# Altium PCB PCB.PcbDoc (part 1 of 2)
Units mm, origin at the board's own origin, x right, y up, seen from the top; angles counter-clockwise.
Board outline 200 x 200 mm, 2 copper layers (Top Layer, Bottom Layer); 385 components, 542 nets, 2285 pads, 56 vias.
Unrouted connection lines stored in the file: 1302.
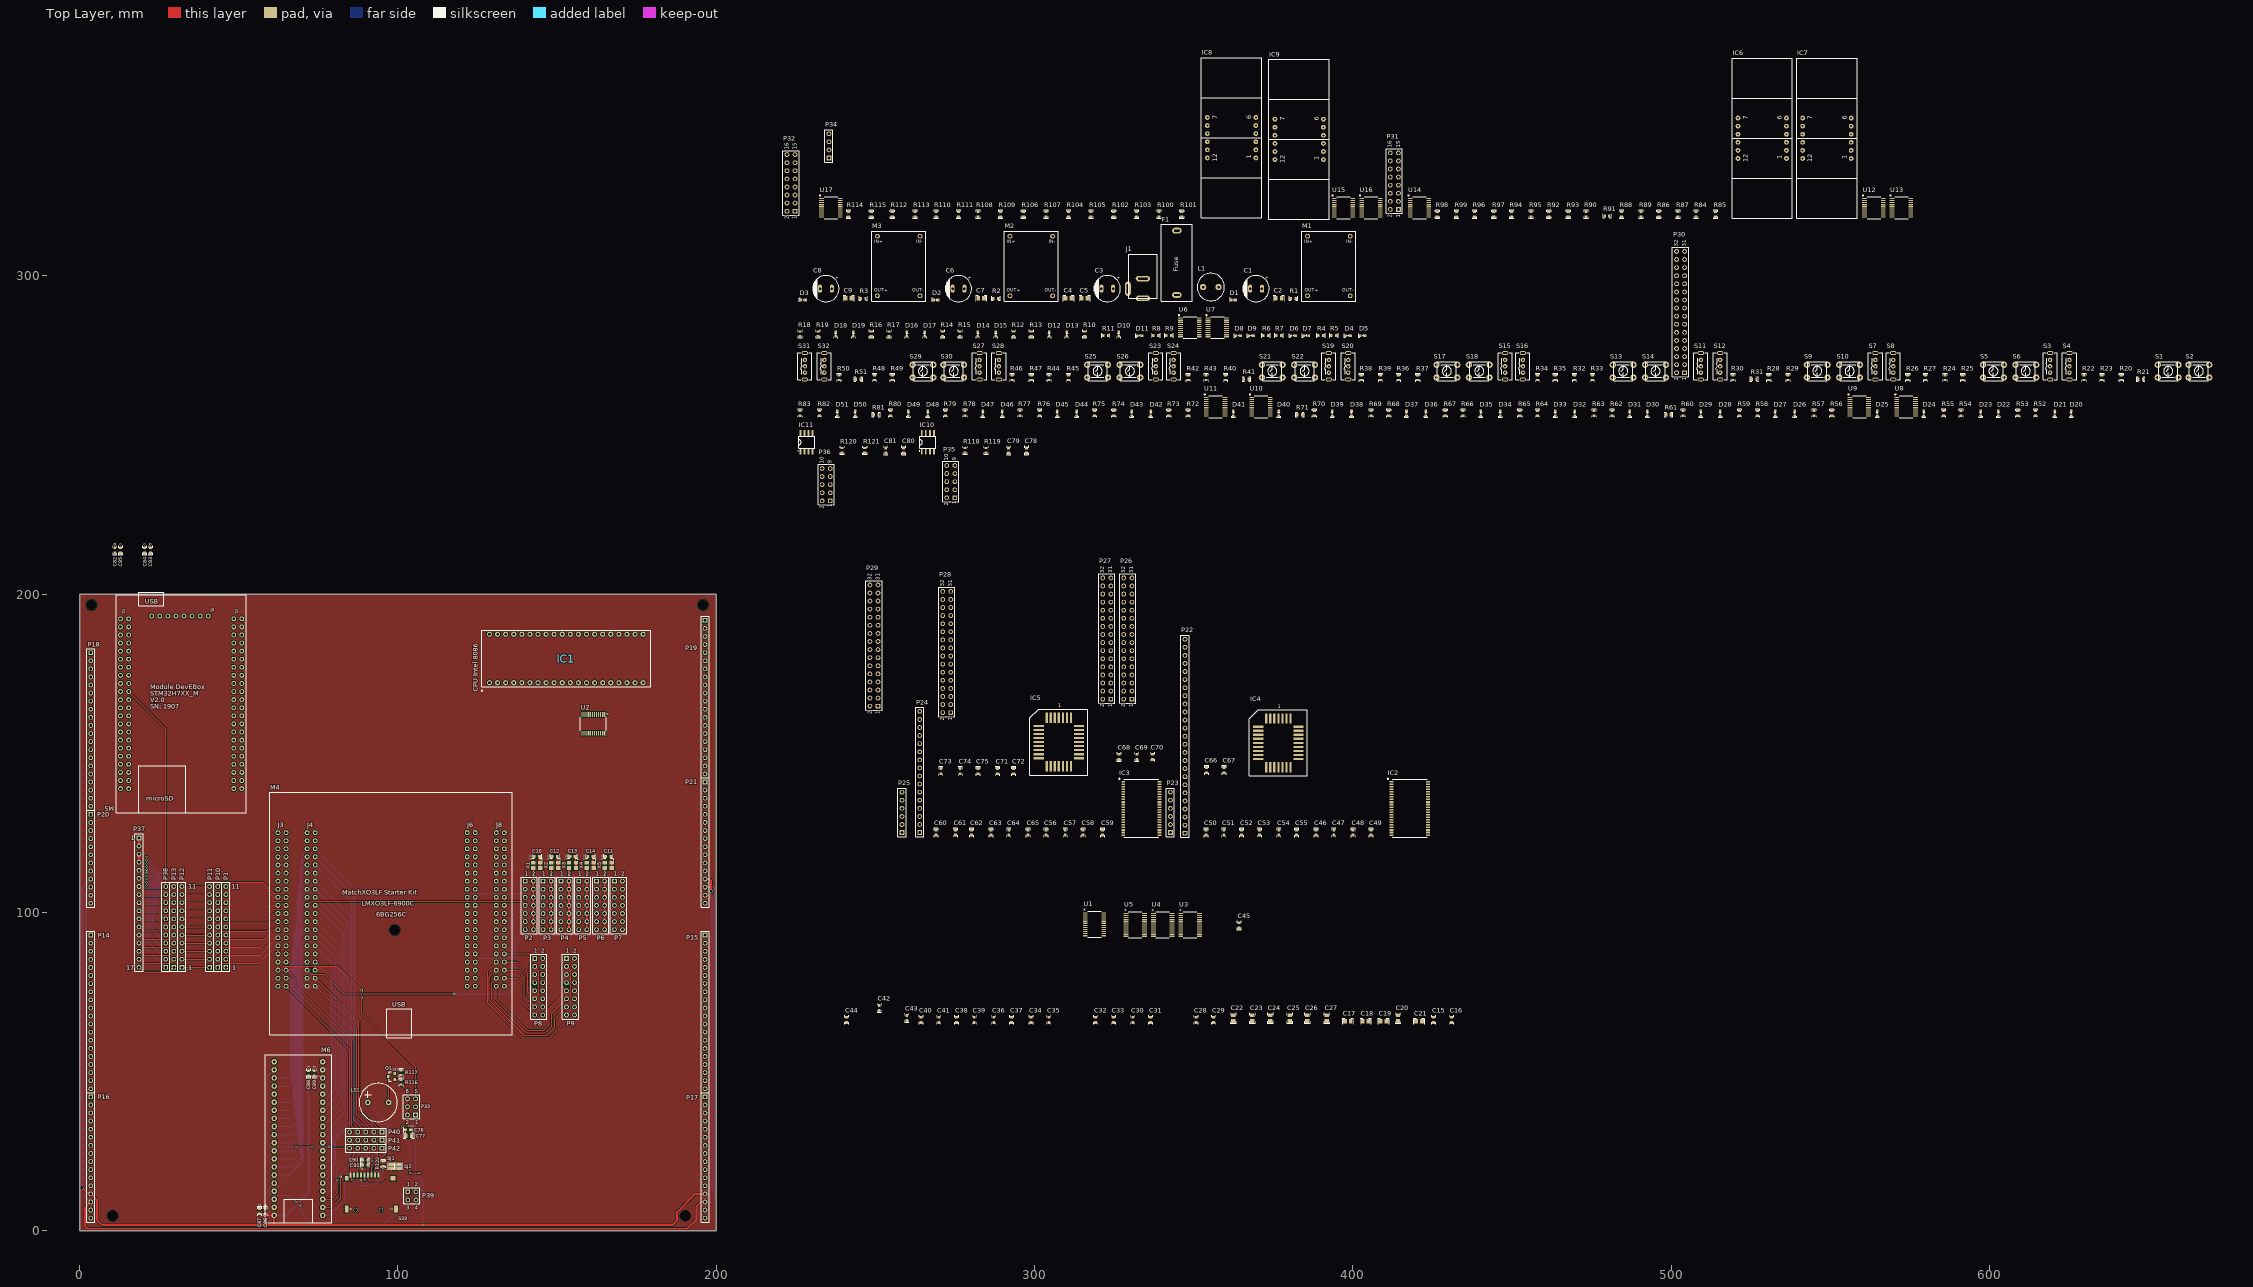
[diagram p0: Top Layer view]
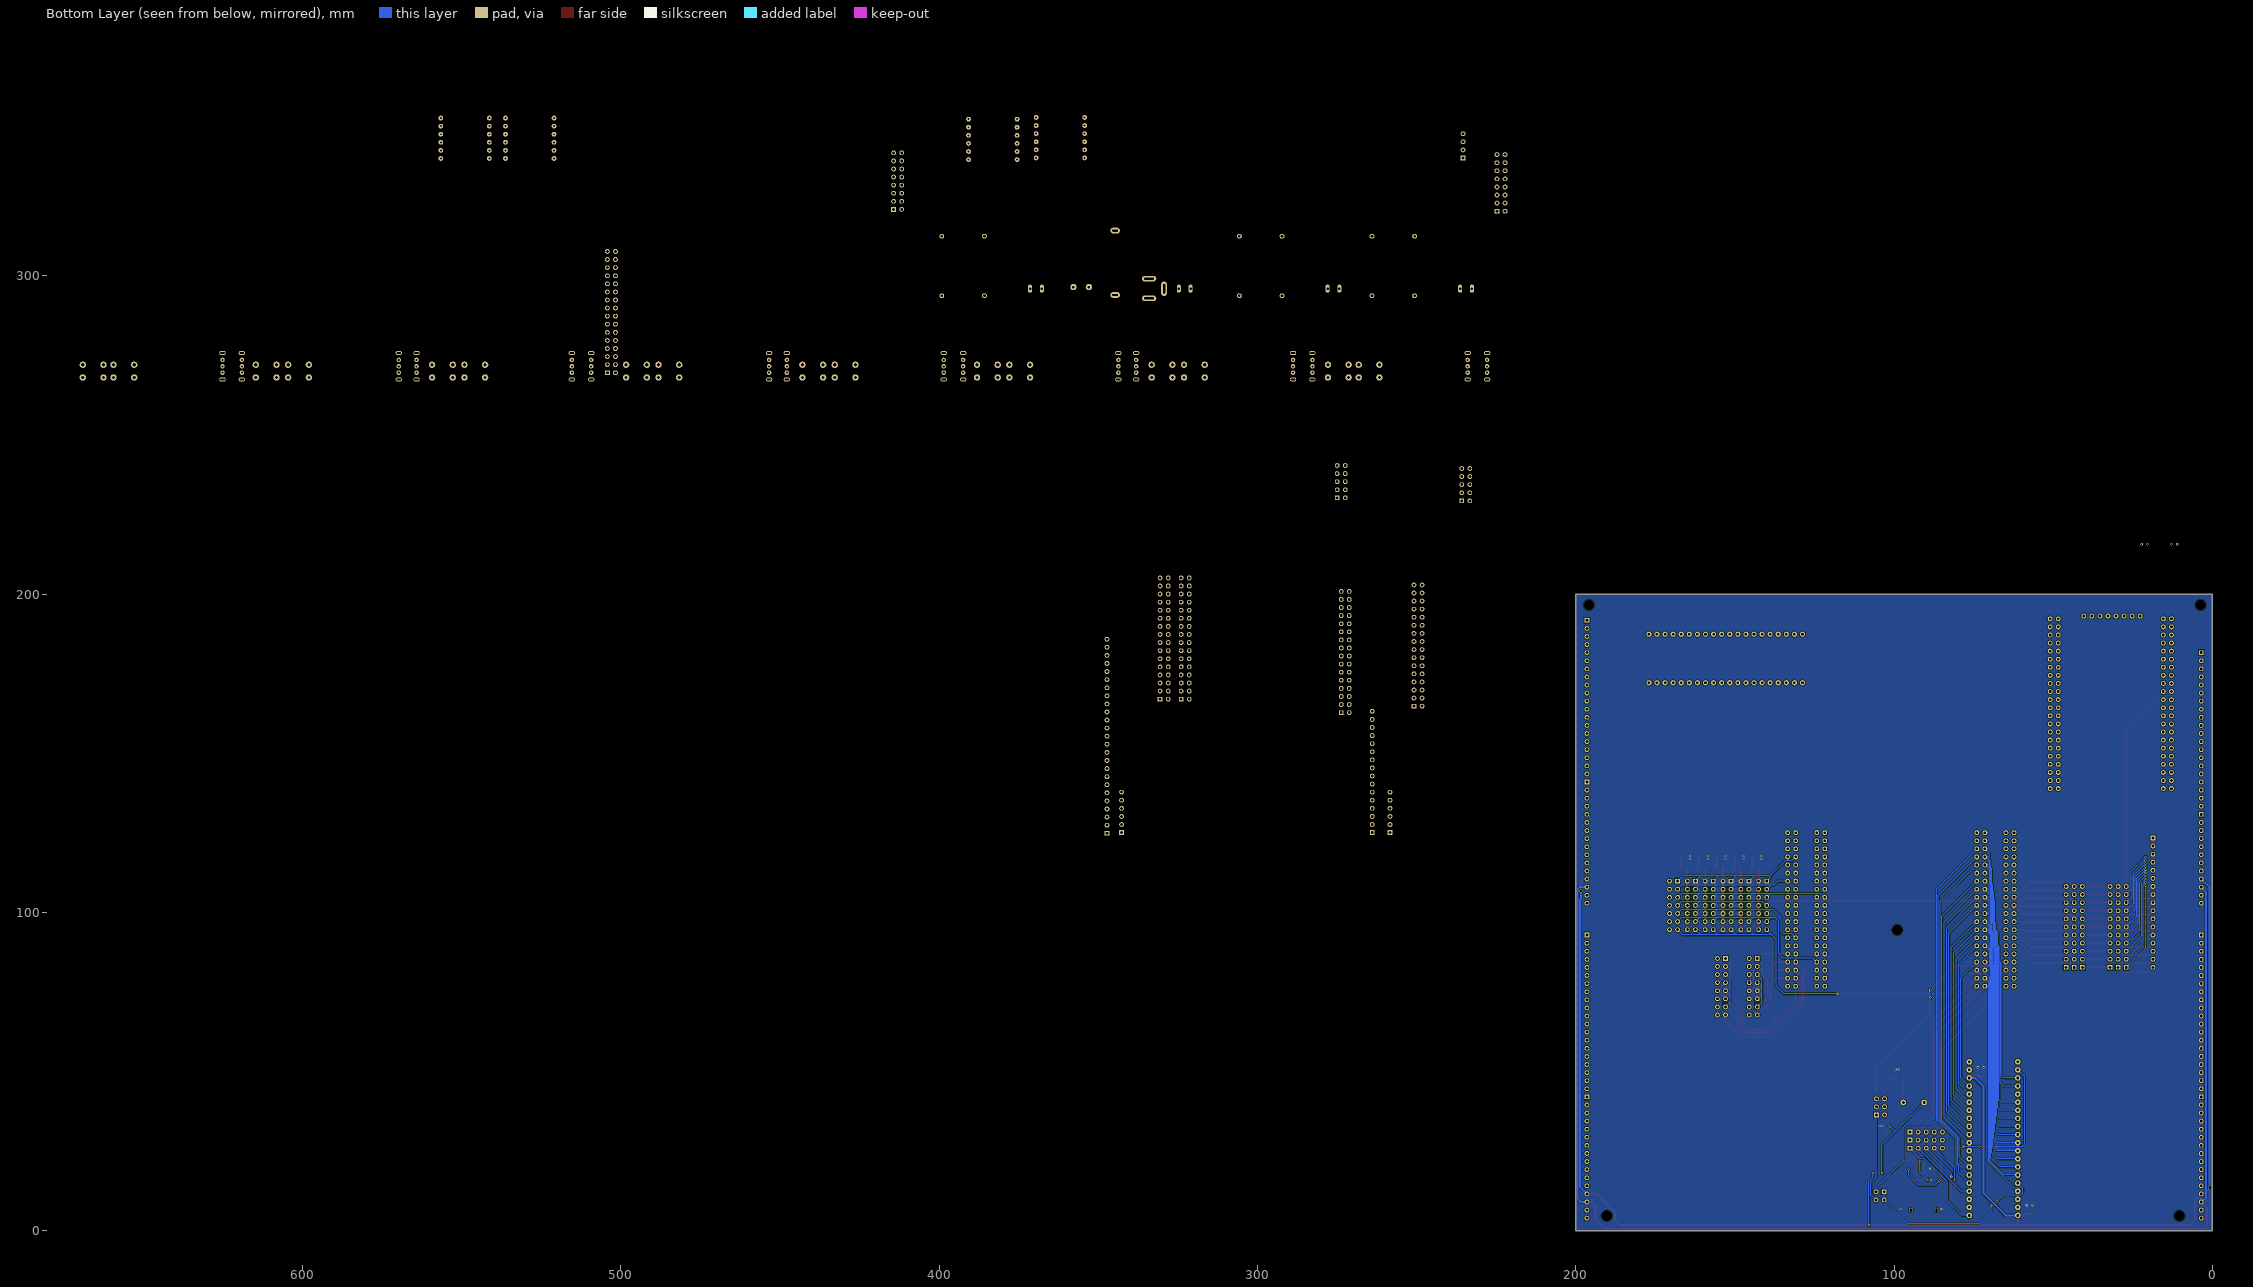
[diagram p1: Bottom Layer view, seen from below]

## Layer stack, top to bottom
Top Solder: solder mask 0.0102, Solder Resist, Dk 3.5
Top Layer: signal copper 0.0356
Dielectric 1: dielectric 0.32, FR-4, Dk 4.8
Bottom Layer: signal copper 0.0356
Bottom Solder: solder mask 0.0102, Solder Resist, Dk 3.5

## Board outline
0,0 0,200 200,200 200,0

## Design rules (kind name [scope] priority, off if disabled: settings)
Clearance [All] p1: gap=0.254 ignorepadtopadclearanceinfootprint=FALSE except(0.16: Arc-Arc Arc-Track Arc-SMDPad Arc-THPad Arc-Via Track-Track Track-SMDPad Track-THPad Track-Via SMDPad-Via THPad-Via Via-Via)
PolygonConnect [All] p1: connectstyle=Relief reliefconductorwidth=0.254 reliefentries=4 polygonreliefangle="90 Angle" airgapwidth=0.254
RoutingVias [All] p1: holewidth=0.3 width=0.7 viastyle="Through Hole" minholewidth=0.3 minwidth=0.4 maxholewidth=2 maxwidth=2.5
SolderMaskExpansion [All] p1: expansion=0.102 istentingtop=FALSE
SupplyNets "Schematic Supply Nets_3" [InNet('Vdd_5V_LCD')] p1: voltage=0.000
SupplyNets "Schematic Supply Nets_2" [InNet('GND')] p2: voltage=0.000
SupplyNets "Schematic Supply Nets_1" [InNet('Vdd_3.3V')] p3: voltage=0.000
SupplyNets "Schematic Supply Nets" [InNet('Vdd_5V')] p4: voltage=0.000
Width [All] p1: maxlimit=2.5 minlimit=0.16 preferedwidth=0.254
30 further rules are at their usual default settings.

## Classes and differential pairs
component class micro_sd: C90 C91 P40 P41 P42 R122 S33 SJ1 SJ2
component class USB_TTL_converter: P34
component class stm32h750: C82 C83 C84 C85 M5
component class stm32f411: C86 C87 C88 C89 M6 P39
component class seven_segment_displays: IC6 IC7 IC8 IC9 P31 P32 R84 R85 R86 R87 R88 R89 R90 R91 R92 R93 R94 R95 R96 R97 R98 R99 R100 R101 R102 R103 R104 R105 R106 R107 R108 R109 R110 R111 R112 R113 R114 R115 U12 U13 U14 U15 U16 U17
component class power_supply: C1 C2 C3 C4 C5 C6 C7 C8 C9 D1 D2 D3 F1 J1 L1 M1 M2 M3 R1 R2 R3
component class pc_data_bus_leds: D4 D5 D6 D7 D8 D9 D10 D11 D12 D13 D14 D15 D16 D17 D18 D19 R4 R5 R6 R7 R8 R9 R10 R11 R12 R13 R14 R15 R16 R17 R18 R19 U6 U7
component class pc_data_bus_input_switches: P30 R20 R21 R22 R23 R24 R25 R26 R27 R28 R29 R30 R31 R32 R33 R34 R35 R36 R37 R38 R39 R40 R41 R42 R43 R44 R45 R46 R47 R48 R49 R50 R51 S1 S2 S3 S4 S5 S6 S7 S8 S9 S10 S11 S12 S13 S14 S15 S16 S17 S18 S19 S20 S21 S22 S23 S24 S25 S26 S27 S28 S29 S30 S31 S32
component class pc_address_bus_leds: D20 D21 D22 D23 D24 D25 D26 D27 D28 D29 D30 D31 D32 D33 D34 D35 D36 D37 D38 D39 D40 D41 D42 D43 D44 D45 D46 D47 D48 D49 D50 D51 R52 R53 R54 R55 R56 R57 R58 R59 R60 R61 R62 R63 R64 R65 R66 R67 R68 R69 R70 R71 R72 R73 R74 R75 R76 R77 R78 R79 R80 R81 R82 R83 U8 U9 U10 U11
component class NOR_flash: C78 C79 C80 C81 IC10 IC11 P35 P36 R118 R119 R120 R121
component class LCD_RGB_parallel_connector: P12 P13 P37 P38
component class IBM_PC_ROM_BIOS: C66 C67 C68 C69 C70 C71 C72 C73 C74 C75 IC4 IC5 P26 P27 P28 P29
component class IBM_PC_RAM: C46 C47 C48 C49 C50 C51 C52 C53 C54 C55 C56 C57 C58 C59 C60 C61 C62 C63 C64 C65 IC2 IC3 P22 P23 P24 P25
component class IBM_PC_CPU: C15 C16 C17 C18 C19 C20 C21 C22 C23 C24 C25 C26 C27 C28 C29 C30 C31 C32 C33 C34 C35 C36 C37 C38 C39 C40 C41 C42 C43 C44 C45 IC1 U1 U2 U3 U4 U5
component class FPGA_J6_J8: C10 C11 C12 C13 C14 P2 P3 P4 P5 P6 P7 P8 P9 X1 X2 X3 X4 X5
component class FPGA_J3_J4: M4 P1 P10 P11
component class FPGA_breadboard_connections: P14 P15 P16 P17 P18 P19 P20 P21
component class buzzer: C76 C77 LS1 P33 Q1 R116 R117

## Components (designator, comment, footprint, x,y, rotation, side; value= is the part's Value field where it differs from the comment)
C1 "Electrolytic capacitor" "electrolytic 470uF/25V" 369.58,296.006 r0 top value=470uF
C2 "ceramic capacitor" "capacitor 0805" 376.692,292.958 r0 top value=100nF
C3 "Electrolytic capacitor" "electrolytic 470uF/25V" 322.844,296.006 r0 top value=470uF
C4 "ceramic capacitor" "capacitor 0805" 310.652,292.958 r0 top value=100nF
C5 "ceramic capacitor" "capacitor 0805" 315.732,292.958 r0 top value=100nF
C6 "Electrolytic capacitor" "electrolytic 470uF/25V" 276.108,296.006 r0 top value=470uF
C7 "ceramic capacitor" "capacitor 0805" 283.22,292.958 r0 top value=100nF
C8 "Electrolytic capacitor" "electrolytic 470uF/25V" 234.452,296.006 r0 top value=470uF
C9 "ceramic capacitor" "capacitor 0805" 241.564,292.958 r0 top value=100nF
C10 "ceramic capacitor" "capacitor 0603" 143.64,117.675 r0 top value=100nF
C11 "ceramic capacitor" "capacitor 0603" 166.04,117.675 r0 top value=100nF
C12 "ceramic capacitor" "capacitor 0603" 149.24,117.675 r0 top value=100nF
C13 "ceramic capacitor" "capacitor 0603" 154.84,117.675 r0 top value=100nF
C14 "ceramic capacitor" "capacitor 0603" 160.44,117.675 r0 top value=100nF
C15 "ceramic capacitor" "capacitor 0603" 425.336,66.33 r90 top value=10uF
C16 "Ceramic capacitor" "capacitor 0603" 430.924,66.33 r90 top value=100nF
C17 "ceramic capacitor" "capacitor 0805" 398.412,65.822 r0 top value=22uF
C18 "ceramic capacitor" "capacitor 0805" 404,65.822 r0 top value=22uF
C19 "ceramic capacitor" "capacitor 0805" 409.588,65.822 r0 top value=22uF
C20 "ceramic capacitor" "capacitor 0805" 414.16,66.838 r90 top value=22uF
C21 "ceramic capacitor" "capacitor 0805" 420.764,65.822 r0 top value=22uF
C22 "ceramic capacitor" "capacitor 0805" 362.344,66.838 r90 top value=100nF
C23 "ceramic capacitor" "capacitor 0805" 368.44,66.838 r90 top value=100nF
C24 "ceramic capacitor" "capacitor 0805" 374.028,66.838 r90 top value=100nF
C25 "ceramic capacitor" "capacitor 0805" 380.124,66.838 r90 top value=100nF
C26 "ceramic capacitor" "capacitor 0805" 385.712,66.838 r90 top value=10nF
C27 "ceramic capacitor" "capacitor 0805" 391.808,66.838 r90 top value=10nF
C28 "Ceramic capacitor" "capacitor 0603" 350.66,66.33 r90 top value=100nF
C29 "ceramic capacitor" "capacitor 0603" 356.248,66.33 r90 top value=10uF
C30 "Ceramic capacitor" "capacitor 0603" 330.848,66.33 r90 top value=100nF
C31 "ceramic capacitor" "capacitor 0603" 336.436,66.33 r90 top value=10uF
C32 "ceramic capacitor" "capacitor 0603" 319.164,66.33 r90 top value=10uF
C33 "Ceramic capacitor" "capacitor 0603" 324.752,66.33 r90 top value=100nF
C34 "ceramic capacitor" "capacitor 0603" 298.844,66.33 r90 top value=10uF
C35 "Ceramic capacitor" "capacitor 0603" 304.432,66.33 r90 top value=100nF
C36 "ceramic capacitor" "capacitor 0603" 287.16,66.33 r90 top value=10uF
C37 "Ceramic capacitor" "capacitor 0603" 292.748,66.33 r90 top value=100nF
C38 "ceramic capacitor" "capacitor 0603" 275.476,66.33 r90 top value=10uF
C39 "Ceramic capacitor" "capacitor 0603" 281.064,66.33 r90 top value=100nF
C40 "Ceramic capacitor" "capacitor 0603" 264.3,66.33 r90 top value=100nF
C41 "ceramic capacitor" "capacitor 0603" 269.888,66.33 r90 top value=10uF
C42 "Ceramic capacitor" "capacitor 0603" 251.2,70.05 r90 top value=100nF
C43 "ceramic capacitor" "capacitor 0603" 259.82,66.93 r90 top value=10uF
C44 "Ceramic capacitor" "capacitor 0603" 240.932,66.33 r90 top value=100nF
C45 "ceramic capacitor" "capacitor 0603" 364.218,96.014 r90 top value=10uF
C46 "ceramic capacitor" "capacitor 0603" 388.388,125.134 r90 top value=22uF
C47 "ceramic capacitor" "capacitor 0603" 393.976,125.134 r90 top value=22uF
C48 "ceramic capacitor" "capacitor 0603" 400.072,125.134 r90 top value=22uF
C49 "ceramic capacitor" "capacitor 0603" 405.66,125.134 r90 top value=22uF
C50 "Ceramic capacitor" "capacitor 0603" 353.844,125.134 r90 top value=10nF
C51 "Ceramic capacitor" "capacitor 0603" 359.432,125.134 r90 top value=10nF
C52 "Ceramic capacitor" "capacitor 0603" 365.02,125.134 r90 top value=100nF
C53 "Ceramic capacitor" "capacitor 0603" 370.608,125.134 r90 top value=100nF
C54 "Ceramic capacitor" "capacitor 0603" 376.704,125.134 r90 top value=100nF
C55 "Ceramic capacitor" "capacitor 0603" 382.292,125.134 r90 top value=100nF
C56 "ceramic capacitor" "capacitor 0603" 303.552,125.134 r90 top value=22uF
C57 "ceramic capacitor" "capacitor 0603" 309.648,125.134 r90 top value=22uF
C58 "ceramic capacitor" "capacitor 0603" 315.236,125.134 r90 top value=22uF
C59 "ceramic capacitor" "capacitor 0603" 321.332,125.134 r90 top value=22uF
C60 "Ceramic capacitor" "capacitor 0603" 269.008,125.134 r90 top value=10nF
C61 "Ceramic capacitor" "capacitor 0603" 275.104,125.134 r90 top value=10nF
C62 "Ceramic capacitor" "capacitor 0603" 280.184,125.134 r90 top value=100nF
C63 "Ceramic capacitor" "capacitor 0603" 286.28,125.134 r90 top value=100nF
C64 "Ceramic capacitor" "capacitor 0603" 291.868,125.134 r90 top value=100nF
C65 "Ceramic capacitor" "capacitor 0603" 297.964,125.134 r90 top value=100nF
C66 "ceramic capacitor" "capacitor 0603" 354,144.75 r90 top value=22uF
C67 "ceramic capacitor" "capacitor 0603" 359.5,144.75 r90 top value=22uF
C68 "Ceramic capacitor" "capacitor 0603" 326.5,148.938 r90 top value=10nF
C69 "Ceramic capacitor" "capacitor 0603" 332.088,148.938 r90 top value=100nF
C70 "Ceramic capacitor" "capacitor 0603" 337,148.95 r90 top value=100nF
C71 "ceramic capacitor" "capacitor 0603" 288.312,144.438 r90 top value=22uF
C72 "ceramic capacitor" "capacitor 0603" 293.392,144.438 r90 top value=22uF
C73 "Ceramic capacitor" "capacitor 0603" 270.532,144.438 r90 top value=10nF
C74 "Ceramic capacitor" "capacitor 0603" 276.628,144.438 r90 top value=100nF
C75 "Ceramic capacitor" "capacitor 0603" 282.216,144.438 r90 top value=100nF
C76 "ceramic capacitor" "capacitor 0603" 103.2,31.8 r180 top value=22uF
C77 "ceramic capacitor" "capacitor 0805" 103.4,29.9 r0 top value=100nF
C78 "ceramic capacitor" "capacitor 0603" 297.444,245.206 r90 top value=10uF
C79 "Ceramic capacitor" "capacitor 0603" 291.856,245.206 r90 top value=100nF
C80 "ceramic capacitor" "capacitor 0603" 258.836,245.206 r90 top value=10uF
C81 "Ceramic capacitor" "capacitor 0603" 253.248,245.206 r90 top value=100nF
C82 "ceramic capacitor" "capacitor 0603" 11.027,213.804 r270 top value=10uF
C83 "ceramic capacitor" "capacitor 0603" 22.227,213.804 r270 top value=10uF
C84 "Ceramic capacitor" "capacitor 0603" 20.4,213.804 r270 top value=100nF
C85 "Ceramic capacitor" "capacitor 0603" 12.827,213.804 r270 top value=100nF
C86 "Ceramic capacitor" "capacitor 0603" 58.3,6.2 r270 top value=100nF
C87 "ceramic capacitor" "capacitor 0603" 56.5,6.2 r270 top value=10uF
C88 "ceramic capacitor" "capacitor 0603" 71.9,49.5 r270 top value=10uF
C89 "Ceramic capacitor" "capacitor 0603" 73.7,49.5 r270 top value=100nF
C90 "ceramic capacitor" "capacitor 0603" 89.696,22.252 r0 top value=10uF
C91 "Ceramic capacitor" "capacitor 0603" 89.696,20.679 r0 top value=100nF
D1 "Green LED" "led 0603 clear" 362.468,292.45 r0 top
D2 "Green LED" "led 0603 clear" 268.996,292.45 r0 top
D3 "Green LED" "led 0603 clear" 227.34,292.45 r0 top
D4 "red LED" "led 0603 clear" 398.536,281.274 r0 top
D5 "red LED" "led 0603 clear" 403.108,281.274 r0 top
D6 "red LED" "led 0603 clear" 381.264,281.274 r0 top
D7 "red LED" "led 0603 clear" 385.328,281.274 r0 top
D8 "red LED" "led 0603 clear" 363.992,281.274 r0 top
D9 "red LED" "led 0603 clear" 368.056,281.274 r0 top
D10 "red LED" "led 0603 clear" 326.4,281.782 r90 top
D11 "red LED" "led 0603 clear" 333.004,281.274 r0 top
D12 "red LED" "led 0603 clear" 304.556,281.782 r90 top
D13 "red LED" "led 0603 clear" 310.144,281.782 r90 top
D14 "red LED" "led 0603 clear" 282.204,281.782 r90 top
D15 "red LED" "led 0603 clear" 287.792,281.782 r90 top
D16 "red LED" "led 0603 clear" 259.852,281.782 r90 top
D17 "red LED" "led 0603 clear" 265.44,281.782 r90 top
D18 "red LED" "led 0603 clear" 237.5,281.782 r90 top
D19 "red LED" "led 0603 clear" 243.088,281.782 r90 top
D20 "red LED" "led 0603 clear" 625.612,256.89 r90 top
D21 "red LED" "led 0603 clear" 620.532,256.89 r90 top
D22 "red LED" "led 0603 clear" 602.752,256.89 r90 top
D23 "red LED" "led 0603 clear" 597.164,256.89 r90 top
D24 "red LED" "led 0603 clear" 579.384,256.89 r90 top
D25 "red LED" "led 0603 clear" 564.652,256.89 r90 top
D26 "red LED" "led 0603 clear" 538.744,256.89 r90 top
D27 "red LED" "led 0603 clear" 532.648,256.89 r90 top
D28 "red LED" "led 0603 clear" 515.376,256.89 r90 top
D29 "red LED" "led 0603 clear" 509.28,256.89 r90 top
D30 "red LED" "led 0603 clear" 492.516,256.89 r90 top
D31 "red LED" "led 0603 clear" 486.928,256.89 r90 top
D32 "red LED" "led 0603 clear" 469.656,256.89 r90 top
D33 "red LED" "led 0603 clear" 463.56,256.89 r90 top
D34 "red LED" "led 0603 clear" 446.288,256.89 r90 top
D35 "red LED" "led 0603 clear" 440.192,256.89 r90 top
D36 "red LED" "led 0603 clear" 422.92,256.89 r90 top
D37 "red LED" "led 0603 clear" 416.824,256.89 r90 top
D38 "red LED" "led 0603 clear" 399.552,256.89 r90 top
D39 "red LED" "led 0603 clear" 393.456,256.89 r90 top
D40 "red LED" "led 0603 clear" 376.692,256.89 r90 top
D41 "red LED" "led 0603 clear" 362.468,256.89 r90 top
D42 "red LED" "led 0603 clear" 336.56,256.89 r90 top
D43 "red LED" "led 0603 clear" 330.464,256.89 r90 top
D44 "red LED" "led 0603 clear" 313.192,256.89 r90 top
D45 "red LED" "led 0603 clear" 307.096,256.89 r90 top
D46 "red LED" "led 0603 clear" 289.824,256.89 r90 top
D47 "red LED" "led 0603 clear" 283.728,256.89 r90 top
D48 "red LED" "led 0603 clear" 266.456,256.89 r90 top
D49 "red LED" "led 0603 clear" 260.36,256.89 r90 top
D50 "red LED" "led 0603 clear" 243.596,256.89 r90 top
D51 "red LED" "led 0603 clear" 238.008,256.89 r90 top
F1 "Fuse" Fuse 344.688,304.134 r90 top value=1A
IC1 "CPU Intel 8086" PDIP-40PIN 177.02,172.2 r90 top
IC2 "Asynchronous SRAM 512K x 8" "TSOP II - 44pin" 417.852,132.754 r0 top
IC3 "Asynchronous SRAM 512K x 8" "TSOP II - 44pin" 333.524,132.754 r0 top
IC4 "NOR FLASH SST39VF0xx" "PLCC 32-pin" 376.58,153.31 r0 top
IC5 "NOR FLASH SST39VF0xx" "PLCC 32-pin" 307.616,153.582 r0 top
IC6 "Seven segment display x 4 digits" "4 digit, seven segment display / 50.3mm x 19mm" 528.584,343.25 r90 top
IC7 "Seven segment display x 4 digits" "4 digit, seven segment display / 50.3mm x 19mm" 548.904,343.25 r90 top
IC8 "Seven segment display x 4 digits" "4 digit, seven segment display / 50.3mm x 19mm" 361.88,343.44 r90 top
IC9 "Seven segment display x 4 digits" "4 digit, seven segment display / 50.3mm x 19mm" 383.12,342.9 r90 top
IC10 "NOR FLASH SPI" "SOP8 / SOIC8 without dissipation" 266.456,247.746 r0 top
IC11 "NOR FLASH SPI" "SOP8 / SOIC8 without dissipation" 228.356,247.746 r0 top
J1 "PWR2.5" "female connector DC-005" 334.02,292.958 r0 top
L1 "Inductor" "ferrite inductor 22uH" 355.356,296.514 r0 top value=22uH
LS1 "Buzzer" "Buzzer 12mm x 8.25mm - 6.5mm pitch" 90.557,40.347 r0 top
M1 "Module regulable Buck" "module step down MP1584" 392.44,303.118 r0 top
M2 "Module regulable Buck" "module step down MP1584" 298.968,303.118 r0 top
M3 "Module regulable Buck" "module step down MP1584" 257.312,303.118 r0 top
M4 "MachXO3LF Starter Kit" "Lattice MachXO3LF starter kit" 59.776,61.62 r0 top
M5 "Module DevEBox STM32H7XX_M" "Module DevEBox STM32H7XX_M" 11.465,131.34 r0 top
M6 "Module Black Pill V3.0" "module black pill v3.0" 68.75,29 r180 top
P1 "Header 11" HDR1X11 45.94,82.8 r90 top
P2 "Header 7X2" HDR2X7 140,109.88 r270 top
P3 "Header 7X2" HDR2X7 145.6,109.88 r270 top
P4 "Header 7X2" HDR2X7 151.2,109.88 r270 top
P5 "Header 7X2" HDR2X7 156.8,109.88 r270 top
P6 "Header 7X2" HDR2X7 162.4,109.88 r270 top
P7 "Header 7X2" HDR2X7 168,109.88 r270 top
P8 "Header 8X2" HDR2X8 142.96,85.62 r270 top
P9 "Header 8X2" HDR2X8 152.96,85.62 r270 top
P10 "Header 11" HDR1X11 43.4,82.8 r90 top
P11 "Header 11" HDR1X11 40.86,82.8 r90 top
P12 "Header 11" HDR1X11 32.14,82.8 r90 top
P13 "Header 11" HDR1X11 29.6,82.8 r90 top
P14 "Header 20" HDR1X20 3.5,92.924 r270 top
P15 "Header 20" HDR1X20 196.5,92.924 r270 top
P16 "Header 16" HDR1X16 3.5,42.124 r270 top
P17 "Header 16" HDR1X16 196.5,42.124 r270 top
P18 "Header 20" HDR1X20 3.5,181.664 r270 top
P19 "Header 20" HDR1X20 196.5,191.824 r270 top
P20 "Header 12" HDR1X12 3.5,130.864 r270 top
P21 "Header 16" HDR1X16 196.5,141.024 r270 top
P22 "Header 25" HDR1X25 347.25,124.93 r90 top
P23 "Header 6" HDR1X6 342.668,125.134 r90 top
P24 "Header 16" HDR1X16 263.928,125.134 r90 top
P25 "Header 6" HDR1X6 258.34,125.134 r90 top
P26 "Header 16X2" HDR2X16 330.556,167.05 r90 top
P27 "Header 16X2" HDR2X16 323.952,167.05 r90 top
P28 "Header 16X2" HDR2X16 273.672,162.818 r90 top
P29 "Header 16X2" HDR2X16 250.812,164.85 r90 top
P30 "Header 16X2" HDR2X16 504.2,269.59 r90 top
P31 "Header 8X2" HDR2X8 414.284,320.898 r90 top
P32 "Header 8X2" HDR2X8 224.75,320.34 r90 top
P33 "Header 3X2" HDR2X3 105.54,36.46 r90 top
P34 "Header 4" HDR1X4 235.4,337.06 r90 top
P35 "Header 5X2" HDR2X5 274.94,230.3 r90 top
P36 "Header 5X2" HDR2X5 235.8,229.36 r90 top
P37 "Header 17" HDR1X17 18.66,123.44 r270 top
P38 "Header 11" HDR1X11 27.06,82.8 r90 top
P39 "Header 2X2" HDR2X2 103.1,12.3 r270 top
P40 "Header 5" HDR1X5 94.98,31.065 r180 top
P41 "Header 5" HDR1X5 94.98,28.525 r180 top
P42 "Header 5" HDR1X5 94.98,25.985 r180 top
Q1 "AO3400A" sot-23 98,48.5 r0 top
R1 "resistor" "resistor 0603" 381.264,292.958 r0 top value=2.2k
R2 "resistor" "resistor 0603" 287.792,292.958 r0 top value=680
R3 "resistor" "resistor 0603" 246.136,292.958 r0 top value=2.2k
R4 "resistor" "resistor 0603" 389.9,281.274 r0 top value=1.5k
R5 "resistor" "resistor 0603" 393.964,281.274 r0 top value=1.5k
R6 "resistor" "resistor 0603" 372.628,281.274 r0 top value=1.5k
R7 "resistor" "resistor 0603" 376.692,281.274 r0 top value=1.5k
R8 "resistor" "resistor 0603" 338.084,281.274 r0 top value=1.5k
R9 "resistor" "resistor 0603" 342.148,281.274 r0 top value=1.5k
R10 "resistor" "resistor 0603" 315.732,281.782 r90 top value=1.5k
R11 "resistor" "resistor 0603" 322.336,281.274 r0 top value=1.5k
R12 "resistor" "resistor 0603" 293.38,281.782 r90 top value=1.5k
R13 "resistor" "resistor 0603" 298.968,281.782 r90 top value=1.5k
R14 "resistor" "resistor 0603" 271.028,281.782 r90 top value=1.5k
R15 "resistor" "resistor 0603" 276.616,281.782 r90 top value=1.5k
R16 "resistor" "resistor 0603" 248.676,281.782 r90 top value=1.5k
R17 "resistor" "resistor 0603" 254.264,281.782 r90 top value=1.5k
R18 "resistor" "resistor 0603" 226.324,281.782 r90 top value=1.5k
R19 "resistor" "resistor 0603" 231.912,281.782 r90 top value=1.5k
R20 "resistor" "resistor 0603" 641.36,268.066 r90 top value=3.3k
R21 "resistor" "resistor 0603" 647.456,267.558 r0 top value=3.3k
R22 "resistor" "resistor 0603" 629.676,268.066 r90 top value=3.3k
R23 "resistor" "resistor 0603" 635.264,268.066 r90 top value=3.3k
R24 "resistor" "resistor 0603" 585.988,268.066 r90 top value=3.3k
R25 "resistor" "resistor 0603" 591.576,268.066 r90 top value=3.3k
R26 "resistor" "resistor 0603" 574.304,268.066 r90 top value=3.3k
R27 "resistor" "resistor 0603" 579.892,268.066 r90 top value=3.3k
R28 "resistor" "resistor 0603" 530.616,268.066 r90 top value=3.3k
R29 "resistor" "resistor 0603" 536.712,268.066 r90 top value=3.3k
R30 "resistor" "resistor 0603" 519.44,268.066 r90 top value=3.3k
R31 "resistor" "resistor 0603" 526.044,267.558 r0 top value=3.3k
R32 "resistor" "resistor 0603" 469.656,268.066 r90 top value=3.3k
R33 "resistor" "resistor 0603" 475.244,268.066 r90 top value=3.3k
R34 "resistor" "resistor 0603" 457.972,268.066 r90 top value=3.3k
R35 "resistor" "resistor 0603" 463.56,268.066 r90 top value=3.3k
R36 "resistor" "resistor 0603" 414.284,268.066 r90 top value=3.3k
R37 "resistor" "resistor 0603" 420.38,268.066 r90 top value=3.3k
R38 "resistor" "resistor 0603" 402.6,268.066 r90 top value=3.3k
R39 "resistor" "resistor 0603" 408.696,268.066 r90 top value=3.3k
R40 "resistor" "resistor 0603" 359.928,268.066 r90 top value=3.3k
R41 "resistor" "resistor 0603" 366.532,267.558 r0 top value=3.3k
R42 "resistor" "resistor 0603" 348.244,268.066 r90 top value=3.3k
R43 "resistor" "resistor 0603" 353.832,268.066 r90 top value=3.3k
R44 "resistor" "resistor 0603" 304.556,268.066 r90 top value=3.3k
R45 "resistor" "resistor 0603" 310.652,268.066 r90 top value=3.3k
R46 "resistor" "resistor 0603" 292.872,268.066 r90 top value=3.3k
R47 "resistor" "resistor 0603" 298.968,268.066 r90 top value=3.3k
R48 "resistor" "resistor 0603" 249.692,268.066 r90 top value=3.3k
R49 "resistor" "resistor 0603" 255.28,268.066 r90 top value=3.3k
R50 "resistor" "resistor 0603" 238.516,268.066 r90 top value=3.3k
R51 "resistor" "resistor 0603" 244.612,267.558 r0 top value=3.3k
R52 "resistor" "resistor 0603" 614.436,256.89 r90 top value=1.5k
R53 "resistor" "resistor 0603" 608.848,256.89 r90 top value=1.5k
R54 "resistor" "resistor 0603" 591.068,256.89 r90 top value=1.5k
R55 "resistor" "resistor 0603" 585.48,256.89 r90 top value=1.5k
R56 "resistor" "resistor 0603" 550.428,256.89 r90 top value=1.5k
R57 "resistor" "resistor 0603" 544.84,256.89 r90 top value=1.5k
R58 "resistor" "resistor 0603" 527.06,256.89 r90 top value=1.5k
R59 "resistor" "resistor 0603" 521.472,256.89 r90 top value=1.5k
R60 "resistor" "resistor 0603" 503.692,256.89 r90 top value=1.5k
R61 "resistor" "resistor 0603" 499.12,256.382 r0 top value=1.5k
R62 "resistor" "resistor 0603" 481.34,256.89 r90 top value=1.5k
R63 "resistor" "resistor 0603" 475.752,256.89 r90 top value=1.5k
R64 "resistor" "resistor 0603" 457.972,256.89 r90 top value=1.5k
R65 "resistor" "resistor 0603" 452.384,256.89 r90 top value=1.5k
R66 "resistor" "resistor 0603" 434.604,256.89 r90 top value=1.5k
R67 "resistor" "resistor 0603" 429.016,256.89 r90 top value=1.5k
R68 "resistor" "resistor 0603" 411.236,256.89 r90 top value=1.5k
R69 "resistor" "resistor 0603" 405.648,256.89 r90 top value=1.5k
R70 "resistor" "resistor 0603" 387.868,256.89 r90 top value=1.5k
R71 "resistor" "resistor 0603" 383.296,256.382 r0 top value=1.5k
R72 "resistor" "resistor 0603" 348.244,256.89 r90 top value=1.5k
R73 "resistor" "resistor 0603" 342.148,256.89 r90 top value=1.5k
R74 "resistor" "resistor 0603" 324.876,256.89 r90 top value=1.5k
R75 "resistor" "resistor 0603" 318.78,256.89 r90 top value=1.5k
R76 "resistor" "resistor 0603" 301.508,256.89 r90 top value=1.5k
R77 "resistor" "resistor 0603" 295.412,256.89 r90 top value=1.5k
R78 "resistor" "resistor 0603" 278.14,256.89 r90 top value=1.5k
R79 "resistor" "resistor 0603" 272.044,256.89 r90 top value=1.5k
R80 "resistor" "resistor 0603" 254.772,256.89 r90 top value=1.5k
R81 "resistor" "resistor 0603" 250.2,256.382 r0 top value=1.5k
R82 "resistor" "resistor 0603" 232.42,256.89 r90 top value=1.5k
R83 "resistor" "resistor 0603" 226.324,256.89 r90 top value=1.5k
R84 "resistor" "resistor 0603" 507.756,319.374 r90 top value=560
R85 "resistor" "resistor 0603" 513.852,319.374 r90 top value=560
R86 "resistor" "resistor 0603" 496.072,319.374 r90 top value=560
R87 "resistor" "resistor 0603" 502.168,319.374 r90 top value=560
R88 "resistor" "resistor 0603" 484.388,319.374 r90 top value=560
R89 "resistor" "resistor 0603" 490.484,319.374 r90 top value=560
R90 "resistor" "resistor 0603" 473.212,319.374 r90 top value=560
R91 "resistor" "resistor 0603" 479.816,318.866 r0 top value=560
R92 "resistor" "resistor 0603" 461.528,319.374 r90 top value=560
R93 "resistor" "resistor 0603" 467.624,319.374 r90 top value=560
R94 "resistor" "resistor 0603" 449.844,319.374 r90 top value=560
R95 "resistor" "resistor 0603" 455.94,319.374 r90 top value=560
R96 "resistor" "resistor 0603" 438.16,319.374 r90 top value=560
R97 "resistor" "resistor 0603" 444.256,319.374 r90 top value=560
R98 "resistor" "resistor 0603" 426.476,319.374 r90 top value=560
R99 "resistor" "resistor 0603" 432.572,319.374 r90 top value=560
R100 "resistor" "resistor 0603" 339.1,319.374 r90 top value=560
R101 "resistor" "resistor 0603" 346.212,319.374 r90 top value=560
R102 "resistor" "resistor 0603" 324.876,319.374 r90 top value=560
R103 "resistor" "resistor 0603" 331.988,319.374 r90 top value=560
R104 "resistor" "resistor 0603" 310.652,319.374 r90 top value=560
R105 "resistor" "resistor 0603" 317.764,319.374 r90 top value=560
R106 "resistor" "resistor 0603" 296.428,319.374 r90 top value=560
R107 "resistor" "resistor 0603" 303.54,319.374 r90 top value=560
R108 "resistor" "resistor 0603" 282.204,319.374 r90 top value=560
R109 "resistor" "resistor 0603" 289.316,319.374 r90 top value=560
R110 "resistor" "resistor 0603" 268.996,319.374 r90 top value=560
R111 "resistor" "resistor 0603" 276.108,319.374 r90 top value=560
R112 "resistor" "resistor 0603" 255.28,319.374 r90 top value=560
R113 "resistor" "resistor 0603" 262.392,319.374 r90 top value=560
R114 "resistor" "resistor 0603" 241.564,319.374 r90 top value=560
R115 "resistor" "resistor 0603" 248.676,319.374 r90 top value=560
R116 "resistor" "resistor 0603" 101,46.75 r90 top value=470
R117 "resistor" "resistor 0603" 101,49.75 r90 top value=100k
R118 "resistor" "resistor 0603" 278.14,245.206 r90 top value=10k
R119 "resistor" "resistor 0603" 284.744,245.206 r90 top value=10k
R120 "resistor" "resistor 0603" 239.532,245.206 r90 top value=10k
R121 "resistor" "resistor 0603" 246.644,245.206 r90 top value=10k
R122 "resistor" "resistor 0603" 95.4,21.125 r90 top value=10k
S1 "Button" "Tact switch" 656.092,270.098 r0 top
S2 "Button" "Tact switch" 665.744,270.098 r0 top
S3 "SW-SPDT" "Slide switch 2mm pitch" 619.008,271.622 r90 top
S4 "SW-SPDT" "Slide switch 2mm pitch" 625.104,271.622 r90 top
S5 "Button" "Tact switch" 601.228,270.098 r0 top
S6 "Button" "Tact switch" 611.388,270.098 r0 top
S7 "SW-SPDT" "Slide switch 2mm pitch" 564.144,271.622 r90 top
S8 "SW-SPDT" "Slide switch 2mm pitch" 569.732,271.622 r90 top
S9 "Button" "Tact switch" 545.856,270.098 r0 top
S10 "Button" "Tact switch" 556.016,270.098 r0 top
S11 "SW-SPDT" "Slide switch 2mm pitch" 509.28,271.622 r90 top
S12 "SW-SPDT" "Slide switch 2mm pitch" 515.376,271.622 r90 top
S13 "Button" "Tact switch" 484.896,270.098 r0 top
S14 "Button" "Tact switch" 495.056,270.098 r0 top
S15 "SW-SPDT" "Slide switch 2mm pitch" 447.812,271.622 r90 top
S16 "SW-SPDT" "Slide switch 2mm pitch" 453.4,271.622 r90 top
S17 "Button" "Tact switch" 429.524,270.098 r0 top
S18 "Button" "Tact switch" 439.684,270.098 r0 top
S19 "SW-SPDT" "Slide switch 2mm pitch" 392.44,271.622 r90 top
S20 "SW-SPDT" "Slide switch 2mm pitch" 398.536,271.622 r90 top
S21 "Button" "Tact switch" 374.66,270.098 r0 top
S22 "Button" "Tact switch" 384.82,270.098 r0 top
S23 "SW-SPDT" "Slide switch 2mm pitch" 338.084,271.622 r90 top
S24 "SW-SPDT" "Slide switch 2mm pitch" 343.672,271.622 r90 top
S25 "Button" "Tact switch" 319.796,270.098 r0 top
S26 "Button" "Tact switch" 329.956,270.098 r0 top
S27 "SW-SPDT" "Slide switch 2mm pitch" 282.712,271.622 r90 top
S28 "SW-SPDT" "Slide switch 2mm pitch" 288.808,271.622 r90 top
S29 "Button" "Tact switch" 264.932,270.098 r0 top
S30 "Button" "Tact switch" 274.584,270.098 r0 top
S31 "SW-SPDT" "Slide switch 2mm pitch" 227.848,271.622 r90 top
S32 "SW-SPDT" "Slide switch 2mm pitch" 233.944,271.622 r90 top
S33 "MicroSD" "Micro sd" 91.65,12.025 r0 top
SJ1 "Solder jumper NO" "normally open solder jumper" 98,19.675 r90 top
SJ2 "Solder jumper NO" "normally open solder jumper" 100.4,19.675 r90 top
U1 "SN74LVC4245APW" PW24 318.829,96.325 r0 top
U2 "SN74LVC4245APW" PW24 161.4,159.3 r270 top
U3 "SN74LVC4245APW" PW24 348.886,96.138 r0 top
U4 "SN74LVC4245APW" PW24 340.25,96.138 r0 top
U5 "SN74LVC4245APW" PW24 331.614,96.138 r0 top
U6 "SN74LVC244APWR" PW20 348.752,283.814 r0 top
U7 "SN74LVC244APWR" PW20 357.388,283.814 r0 top
U8 "SN74LVC244APWR" PW20 573.796,258.922 r0 top
U9 "SN74LVC244APWR" PW20 559.064,258.922 r0 top
U10 "SN74LVC244APWR" PW20 371.104,258.922 r0 top
U11 "SN74LVC244APWR" PW20 356.88,258.922 r0 top
U12 "SN74LVC244APWR" PW20 563.636,321.406 r0 top
U13 "SN74LVC244APWR" PW20 572.272,321.406 r0 top
U14 "SN74LVC244APWR" PW20 420.888,321.406 r0 top
U15 "SN74LVC244APWR" PW20 397.012,321.406 r0 top
U16 "SN74LVC244APWR" PW20 405.648,321.406 r0 top
U17 "SN74LVC244APWR" PW20 235.976,321.406 r0 top
X1 "Active oscillator 50MHz" "Active oscillator 3.2mm x 2.5mm" 143.64,114.825 r180 top
X2 "Active oscillator 25MHz" "Active oscillator 3.2mm x 2.5mm" 149.24,114.825 r180 top
X3 "Active oscillator 24MHz" "Active oscillator 3.2mm x 2.5mm" 154.84,114.825 r180 top
X4 "Active oscillator 18.432MHz" "Active oscillator 3.2mm x 2.5mm" 160.44,114.825 r180 top
X5 "Active oscillator 8MHz" "Active oscillator 3.2mm x 2.5mm" 166.04,114.825 r180 top

## Footprints (in the part's own frame and the unit in brackets; to place one, negate y for a bottom-side part, rotate by r counter-clockwise, add the part's x,y. Pads: shape width x height; smd on the part's side, far side on the other; paste and mask are expansions set on the pad)
"4 digit, seven segment display / 50.3mm x 19mm" [mm] "4 digit, seven segment display / 50.3mm x 19mm"
  round 1.5 / inner round 1.524 / far side round 1.5 hole 0.6: 1(-6.35,-7.62) 2(-3.81,-7.62) 3(-1.27,-7.62) 4(1.27,-7.62) 5(3.81,-7.62) 6(6.35,-7.62) 7(6.35,7.62) 8(3.81,7.62) 9(1.27,7.62) 10(-1.27,7.62) 11(-3.81,7.62) 12(-6.35,7.62)
  silkscreen extent -25.15,-9.5 25.15,9.5
"Active oscillator 3.2mm x 2.5mm" [mm] "Active oscillator 3.2mm x 2.5mm"
  rect 1.4x1.2 smd: 1(-1.1,-0.85) 2(1.1,-0.85) 3(1.1,0.85) 4(-1.1,0.85)
  silkscreen extent -1.7,-1.9 -1.6,-1.8, body extent -1.6,-1.25 1.6,1.25, height 0.82
"Buzzer 12mm x 8.25mm - 6.5mm pitch" [mm] "Buzzer 12mm x 8.25mm - 6.5mm pitch"
  round 1.75 / inner round 1.524 / far side round 1.75 hole 0.85: 1(0,0) 2(6.5,0)
  silkscreen extent -2.75,-6 9.25,6
"capacitor 0603" [mm] "capacitor 0603 1.6mm x 0.8mm"
  rect 0.9x0.9 smd: 1(-0.8,0) 2(0.8,0)
  silkscreen extent -1.52,-0.72 1.52,0.72, body extent -1,-0.39 1,0.39, height 0.8
"capacitor 0805" [mm] "capacitor 0805 2mm x 1.25mm"
  rect 1.2x1.4 smd: 1(-0.925,0) 2(0.925,0)
  silkscreen extent -1.79,-0.97 1.79,0.97, body extent -1.3,-0.62 1.3,0.63, height 0.78
"electrolytic 470uF/25V" [mm] "electrolytic capacitor 470uF/25V - 8.4mm diam. - 3.7mm pitch"
  oval 1.27x2.54 hole 0.8: 1(1.85,0) 2(-1.85,0)
  silkscreen extent -4.12,-4.12 4.12,4.12, body extent -4,-4 4,4, height 12.01
"female connector DC-005" [mm] "female connector DC-005"
  oval 4.5x1.8 hole 0.6 slot 3 at 0 deg: 1(0,0) 2(0,6.2)
  oval 1.8x4.5 hole 0.6 slot 3 at 90 deg: 3(-4.7,3)
  silkscreen extent -4.5,0 4.5,13.9
"ferrite inductor 22uH" [mm] "ferrite inductor 22uH, 4.86mm pitch, 8.6mm radius"
  round 2 hole 0.8: 1(-2.43,0) 2(2.43,0)
  silkscreen extent -4.3,-4.3 4.3,4.3, body extent -3.35,-3.35 3.35,3.35, height 10
Fuse [mm] "Fuse"
  oval 1.8x3 hole 0.6 slot 1.75 at 90 deg: 1(-10.11,0) 2(10.11,0)
  silkscreen extent -12.05,-4.9 12.05,4.9
HDR1X4 [mm] "Connector; Header; 4 Position"
  rect 1.5x1.5 hole 0.9: 1(0,0)
  round 1.5 hole 0.9: 2(2.54,0) 3(5.08,0) 4(7.62,0)
  silkscreen extent -1.27,-1.27 8.89,1.27
HDR1X5 [mm] "Connector; Header; 5 Position"
  rect 1.5x1.5 hole 0.9: 1(0,0)
  round 1.5 hole 0.9: 2(2.54,0) 3(5.08,0) 4(7.62,0) 5(10.16,0)
  silkscreen extent -1.27,-1.27 11.43,1.27
HDR1X6 [mm] "Connector; Header; 6 Position"
  rect 1.5x1.5 hole 0.9: 1(0,0)
  round 1.5 hole 0.9: 2(2.54,0) 3(5.08,0) 4(7.62,0) 5(10.16,0) 6(12.7,0)
  silkscreen extent -1.27,-1.27 13.97,1.27
HDR1X11 [mm] "Connector; Header; 11 Position"
  rect 1.5x1.5 hole 0.9: 1(0,0)
  round 1.5 hole 0.9: 2(2.54,0) 3(5.08,0) 4(7.62,0) 5(10.16,0) 6(12.7,0) 7(15.24,0) 8(17.78,0) 9(20.32,0) 10(22.86,0) 11(25.4,0)
  silkscreen extent -1.27,-1.27 26.67,1.27
HDR1X12 [mm] "Connector; Header; 12 Position"
  rect 1.5x1.5 hole 0.9: 1(0,0)
  round 1.5 hole 0.9: 2(2.54,0) 3(5.08,0) 4(7.62,0) 5(10.16,0) 6(12.7,0) 7(15.24,0) 8(17.78,0) 9(20.32,0) 10(22.86,0) 11(25.4,0) 12(27.94,0)
  silkscreen extent -1.27,-1.27 29.21,1.27
HDR1X16 [mm] "Connector; Header; 16 Position"
  rect 1.5x1.5 hole 0.9: 1(0,0)
  round 1.5 hole 0.9: 2(2.54,0) 3(5.08,0) 4(7.62,0) 5(10.16,0) 6(12.7,0) 7(15.24,0) 8(17.78,0) 9(20.32,0) 10(22.86,0) 11(25.4,0) 12(27.94,0) 13(30.48,0) 14(33.02,0) 15(35.56,0) 16(38.1,0)
  silkscreen extent -1.27,-1.27 39.37,1.27
HDR1X17 [mm] "Connector; Header; 17 Position"
  rect 1.5x1.5 hole 0.9: 1(0,0)
  round 1.5 hole 0.9: 2(2.54,0) 3(5.08,0) 4(7.62,0) 5(10.16,0) 6(12.7,0) 7(15.24,0) 8(17.78,0) 9(20.32,0) 10(22.86,0) 11(25.4,0) 12(27.94,0) 13(30.48,0) 14(33.02,0) 15(35.56,0) 16(38.1,0) 17(40.64,0)
  silkscreen extent -1.27,-1.27 41.91,1.27
HDR1X20 [mm] "Connector; Header; 20 Position"
  rect 1.5x1.5 hole 0.9: 1(0,0)
  round 1.5 hole 0.9: 2(2.54,0) 3(5.08,0) 4(7.62,0) 5(10.16,0) 6(12.7,0) 7(15.24,0) 8(17.78,0) 9(20.32,0) 10(22.86,0) 11(25.4,0) 12(27.94,0) 13(30.48,0) 14(33.02,0) 15(35.56,0) 16(38.1,0) 17(40.64,0) 18(43.18,0) 19(45.72,0) 20(48.26,0)
  silkscreen extent -1.27,-1.27 49.53,1.27
HDR1X25 [mm] "Connector; Header; 25 Position"
  rect 1.5x1.5 hole 0.9: 1(0,0)
  round 1.5 hole 0.9: 2(2.54,0) 3(5.08,0) 4(7.62,0) 5(10.16,0) 6(12.7,0) 7(15.24,0) 8(17.78,0) 9(20.32,0) 10(22.86,0) 11(25.4,0) 12(27.94,0) 13(30.48,0) 14(33.02,0) 15(35.56,0) 16(38.1,0) 17(40.64,0) 18(43.18,0) 19(45.72,0) 20(48.26,0) 21(50.8,0) 22(53.34,0) 23(55.88,0) 24(58.42,0) 25(60.96,0)
  silkscreen extent -1.27,-1.27 62.23,1.27
HDR2X2 [mm] "Connector; Header; 2x2 Position"
  rect 1.5x1.5 hole 0.9: 1(0,0)
  round 1.5 hole 0.9: 2(0,2.54) 3(2.54,0) 4(2.54,2.54)
  silkscreen extent -1.27,-1.27 3.81,3.81
HDR2X3 [mm] "Connector; Header; 3x2 Position"
  rect 1.5x1.5 hole 0.9: 1(0,0)
  round 1.5 hole 0.9: 2(0,2.54) 3(2.54,0) 4(2.54,2.54) 5(5.08,0) 6(5.08,2.54)
  silkscreen extent -1.27,-1.27 6.35,3.81
HDR2X5 [mm] "Connector; Header; 5x2 Position"
  rect 1.5x1.5 hole 0.9: 1(0,0)
  round 1.5 hole 0.9: 2(0,2.54) 3(2.54,0) 4(2.54,2.54) 5(5.08,0) 6(5.08,2.54) 7(7.62,0) 8(7.62,2.54) 9(10.16,0) 10(10.16,2.54)
  silkscreen extent -1.27,-1.27 11.43,3.81
HDR2X7 [mm] "Connector; Header; 7x2 Position"
  rect 1.5x1.5 hole 0.9: 1(0,0)
  round 1.5 hole 0.9: 2(0,2.54) 3(2.54,0) 4(2.54,2.54) 5(5.08,0) 6(5.08,2.54) 7(7.62,0) 8(7.62,2.54) 9(10.16,0) 10(10.16,2.54) 11(12.7,0) 12(12.7,2.54) 13(15.24,0) 14(15.24,2.54)
  silkscreen extent -1.27,-1.27 16.51,3.81
HDR2X8 [mm] "Connector; Header; 8x2 Position"
  rect 1.5x1.5 hole 0.9: 1(0,0)
  round 1.5 hole 0.9: 2(0,2.54) 3(2.54,0) 4(2.54,2.54) 5(5.08,0) 6(5.08,2.54) 7(7.62,0) 8(7.62,2.54) 9(10.16,0) 10(10.16,2.54) 11(12.7,0) 12(12.7,2.54) 13(15.24,0) 14(15.24,2.54) 15(17.78,0) 16(17.78,2.54)
  silkscreen extent -1.27,-1.27 19.05,3.81
HDR2X16 [mm] "Connector; Header; 16x2 Position"
  rect 1.5x1.5 hole 0.9: 1(0,0)
  round 1.5 hole 0.9: 2(0,2.54) 3(2.54,0) 4(2.54,2.54) 5(5.08,0) 6(5.08,2.54) 7(7.62,0) 8(7.62,2.54) 9(10.16,0) 10(10.16,2.54) 11(12.7,0) 12(12.7,2.54) 13(15.24,0) 14(15.24,2.54) 15(17.78,0) 16(17.78,2.54) 17(20.32,0) 18(20.32,2.54) 19(22.86,0) 20(22.86,2.54) 21(25.4,0) 22(25.4,2.54) 23(27.94,0) 24(27.94,2.54) 25(30.48,0) 26(30.48,2.54) 27(33.02,0) 28(33.02,2.54) 29(35.56,0) 30(35.56,2.54) 31(38.1,0) 32(38.1,2.54)
  silkscreen extent -1.27,-1.27 39.37,3.81
"Lattice MachXO3LF starter kit" [mil] "FPGA development board - MachXO3LF Starter Kit"
  round 60 hole 32.68: J3_1(100,2500) J3_2(200,2500) J3_3(100,2400) J3_4(200,2400) J3_5(100,2300) J3_6(200,2300) J3_7(100,2200) J3_8(200,2200) J3_9(100,2100) J3_10(200,2100) J3_11(100,2000) J3_12(200,2000) J3_13(100,1900) J3_14(200,1900) J3_15(100,1800) J3_16(200,1800) J3_17(100,1700) J3_18(200,1700) J3_19(100,1600) J3_20(200,1600) J3_21(100,1500) J3_22(200,1500) J3_23(100,1400) J3_24(200,1400) J3_25(100,1300) J3_26(200,1300) J3_27(100,1200) J3_28(200,1200) J3_29(100,1100) J3_30(200,1100) J3_31(100,1000) J3_32(200,1000) J3_33(100,900) J3_34(200,900) J3_35(100,800) J3_36(200,800) J3_37(100,700) J3_38(200,700) J3_39(100,600) J3_40(200,600) J4_1(460,2500) J4_2(560,2500) J4_3(460,2400) J4_4(560,2400) J4_5(460,2300) J4_6(560,2300) J4_7(460,2200) J4_8(560,2200) J4_9(460,2100) J4_10(560,2100) J4_11(460,2000) J4_12(560,2000) J4_13(460,1900) J4_14(560,1900) J4_15(460,1800) J4_16(560,1800) J4_17(460,1700) J4_18(560,1700) J4_19(460,1600) J4_20(560,1600) J4_21(460,1500) J4_22(560,1500) J4_23(460,1400) J4_24(560,1400) J4_25(460,1300) J4_26(560,1300) J4_27(460,1200) J4_28(560,1200) J4_29(460,1100) J4_30(560,1100) J4_31(460,1000) J4_32(560,1000) J4_33(460,900) J4_34(560,900) J4_35(460,800) J4_36(560,800) J4_37(460,700) J4_38(560,700) J4_39(460,600) J4_40(560,600) J6_1(2440,2500) J6_2(2540,2500) J6_3(2440,2400) J6_4(2540,2400) J6_5(2440,2300) J6_6(2540,2300) J6_7(2440,2200) J6_8(2540,2200) J6_9(2440,2100) J6_10(2540,2100) J6_11(2440,2000) J6_12(2540,2000) J6_13(2440,1900) J6_14(2540,1900) J6_15(2440,1800) J6_16(2540,1800) J6_17(2440,1700) J6_18(2540,1700) J6_19(2440,1600) J6_20(2540,1600) J6_21(2440,1500) J6_22(2540,1500) J6_23(2440,1400) J6_24(2540,1400) J6_25(2440,1300) J6_26(2540,1300) J6_27(2440,1200) J6_28(2540,1200) J6_29(2440,1100) J6_30(2540,1100) J6_31(2440,1000) J6_32(2540,1000) J6_33(2440,900) J6_34(2540,900) J6_35(2440,800) J6_36(2540,800) J6_37(2440,700) J6_38(2540,700) J6_39(2440,600) J6_40(2540,600) J8_1(2800,2500) J8_2(2900,2500) J8_3(2800,2400) J8_4(2900,2400) J8_5(2800,2300) J8_6(2900,2300) J8_7(2800,2200) J8_8(2900,2200) J8_9(2800,2100) J8_10(2900,2100) J8_11(2800,2000) J8_12(2900,2000) J8_13(2800,1900) J8_14(2900,1900) J8_15(2800,1800) J8_16(2900,1800) J8_17(2800,1700) J8_18(2900,1700) J8_19(2800,1600) J8_20(2900,1600) J8_21(2800,1500) J8_22(2900,1500) J8_23(2800,1400) J8_24(2900,1400) J8_25(2800,1300) J8_26(2900,1300) J8_27(2800,1200) J8_28(2900,1200) J8_29(2800,1100) J8_30(2900,1100) J8_31(2800,1000) J8_32(2900,1000) J8_33(2800,900) J8_34(2900,900) J8_35(2800,800) J8_36(2900,800) J8_37(2800,700) J8_38(2900,700) J8_39(2800,600) J8_40(2900,600)
  silkscreen extent 0,-35 3000,3000
"led 0603 clear" [mm] "led 0603 clear 1.6mm x 0.8mm"
  rect 0.8x0.8 smd: 1(0.75,0) 2(-0.75,0)
  silkscreen extent -1.42,-0.67 0.24,0.67, body extent -0.83,-0.35 0.83,0.38, height 0.68
"Micro sd" [mm] "Micro SD memory port"
  round 1.2 hole 1: 0(-4.95,-5.5) 0(3.05,-5.5)
  rect 0.7x1.6 smd: 1(2.25,5.5) 2(1.15,5.5) 3(0.05,5.5) 4(-1.05,5.5) 5(-2.15,5.5) 6(-3.25,5.5) 7(-4.35,5.5) 8(-5.45,5.5) 9(-6.55,5.5)
  rect 1.2x2.2 smd: 10(-7.75,-5.1) 10(7.75,-5.1)
  rect 1.2x1.5 smd: 10(-7.75,4.5)
  rect 1.6x1.5 smd: 10(6.85,4.5)
  body extent -8.2,-9.53 8.2,5.47, height 1.82
"module black pill v3.0" [mm] "module black pill v3.0"
  round 1.75 / inner round 1.524 / far side round 1.75 hole 0.85: 1(-7.62,24.13) 2(-7.62,21.59) 3(-7.62,19.05) 4(-7.62,16.51) 5(-7.62,13.97) 6(-7.62,11.43) 7(-7.62,8.89) 8(-7.62,6.35) 9(-7.62,3.81) 10(-7.62,1.27) 11(-7.62,-1.27) 12(-7.62,-3.81) 13(-7.62,-6.35) 14(-7.62,-8.89) 15(-7.62,-11.43) 16(-7.62,-13.97) 17(-7.62,-16.51) 18(-7.62,-19.05) 19(-7.62,-21.59) 20(-7.62,-24.13) 21(7.62,-24.13) 22(7.62,-21.59) 23(7.62,-19.05) 24(7.62,-16.51) 25(7.62,-13.97) 26(7.62,-11.43) 27(7.62,-8.89) 28(7.62,-6.35) 29(7.62,-3.81) 30(7.62,-1.27) 31(7.62,1.27) 32(7.62,3.81) 33(7.62,6.35) 34(7.62,8.89) 35(7.62,11.43) 36(7.62,13.97) 37(7.62,16.51) 38(7.62,19.05) 39(7.62,21.59) 40(7.62,24.13)
  silkscreen extent -10.39,-26.4 10.39,26.4, body extent -10.39,-26.19 10.39,26.35, height 5.06
"Module DevEBox STM32H7XX_M" [mm] "Module DevEBox STM32H7XX_M V2.0 SN: 1907"
  round 1.524 hole 0.83: J2_1(1.395,60.96) J2_2(3.935,60.96) J2_3(1.395,58.42) J2_4(3.935,58.42) J2_5(1.395,55.88) J2_6(3.935,55.88) J2_7(1.395,53.34) J2_8(3.935,53.34) J2_9(1.395,50.8) J2_10(3.935,50.8) J2_11(1.395,48.26) J2_12(3.935,48.26) J2_13(1.395,45.72) J2_14(3.935,45.72) J2_15(1.395,43.18) J2_16(3.935,43.18) J2_17(1.395,40.64) J2_18(3.935,40.64) J2_19(1.395,38.1) J2_20(3.935,38.1) J2_21(1.395,35.56) J2_22(3.935,35.56) J2_23(1.395,33.02) J2_24(3.935,33.02) J2_25(1.395,30.48) J2_26(3.935,30.48) J2_27(1.395,27.94) J2_28(3.935,27.94) J2_29(1.395,25.4) J2_30(3.935,25.4) J2_31(1.395,22.86) J2_32(3.935,22.86) J2_33(1.395,20.32) J2_34(3.935,20.32) J2_35(1.395,17.78) J2_36(3.935,17.78) J2_37(1.395,15.24) J2_38(3.935,15.24) J2_39(1.395,12.7) J2_40(3.935,12.7) J2_41(1.395,10.16) J2_42(3.935,10.16) J2_43(1.395,7.62) J2_44(3.935,7.62) J3_1(36.955,60.96) J3_2(39.495,60.96) J3_3(36.955,58.42) J3_4(39.495,58.42) J3_5(36.955,55.88) J3_6(39.495,55.88) J3_7(36.955,53.34) J3_8(39.495,53.34) J3_9(36.955,50.8) J3_10(39.495,50.8) J3_11(36.955,48.26) J3_12(39.495,48.26) J3_13(36.955,45.72) J3_14(39.495,45.72) J3_15(36.955,43.18) J3_16(39.495,43.18) J3_17(36.955,40.64) J3_18(39.495,40.64) J3_19(36.955,38.1) J3_20(39.495,38.1) J3_21(36.955,35.56) J3_22(39.495,35.56) J3_23(36.955,33.02) J3_24(39.495,33.02) J3_25(36.955,30.48) J3_26(39.495,30.48) J3_27(36.955,27.94) J3_28(39.495,27.94) J3_29(36.955,25.4) J3_30(39.495,25.4) J3_31(36.955,22.86) J3_32(39.495,22.86) J3_33(36.955,20.32) J3_34(39.495,20.32) J3_35(36.955,17.78) J3_36(39.495,17.78) J3_37(36.955,15.24) J3_38(39.495,15.24) J3_39(36.955,12.7) J3_40(39.495,12.7) J3_41(36.955,10.16) J3_42(39.495,10.16) J3_43(36.955,7.62) J3_44(39.495,7.62) J4_1(28.955,61.82) J4_2(26.415,61.82) J4_3(23.875,61.82) J4_4(21.335,61.82) J4_5(18.795,61.82) J4_6(16.255,61.82) J4_7(13.715,61.82) J4_8(11.175,61.82)
  silkscreen extent 0,0 40.89,69.25
"module step down MP1584" [mm] "regulable step down converter 1A"
  round 1.524 hole 0.83: 1(6.7,9.35) 2(-6.7,9.35) 3(-6.7,-9.35) 4(6.7,-9.35)
  silkscreen extent -8.5,-11 8.5,11
"normally open solder jumper" [mm] "normally open solder jumper"
  rect 1x1.5 smd: 1(0,0) 2(1.25,0)
  silkscreen extent -0.5,-0.97 1.75,0.97
PDIP-40PIN [mm] "PDIP-40PIN"
  round 1.6 / inner round 1.524 / far side round 1.6 hole 0.8: 1(0,48.26) 2(0,45.72) 3(0,43.18) 4(0,40.64) 5(0,38.1) 6(0,35.56) 7(0,33.02) 8(0,30.48) 9(0,27.94) 10(0,25.4) 11(0,22.86) 12(0,20.32) 13(0,17.78) 14(0,15.24) 15(0,12.7) 16(0,10.16) 17(0,7.62) 18(0,5.08) 19(0,2.54) 20(0,0) 21(15.24,0) 22(15.24,2.54) 23(15.24,5.08) 24(15.24,7.62) 25(15.24,10.16) 26(15.24,12.7) 27(15.24,15.24) 28(15.24,17.78) 29(15.24,20.32) 30(15.24,22.86) 31(15.24,25.4) 32(15.24,27.94) 33(15.24,30.48) 34(15.24,33.02) 35(15.24,35.56) 36(15.24,38.1) 37(15.24,40.64) 38(15.24,43.18) 39(15.24,45.72) 40(15.24,48.26)
  silkscreen extent -2.6,-2.47 16.5,50.73
"PLCC 32-pin" [mm] "PLCC 32-pin"
  rect 0.7x3.2 smd: 1(0,7.625) 2(-1.27,7.625) 3(-2.54,7.625) 4(-3.81,7.625) 14(-3.81,-7.625) 15(-2.54,-7.625) 16(-1.27,-7.625) 17(0,-7.625) 18(1.27,-7.625) 19(2.54,-7.625) 20(3.81,-7.625) 30(3.81,7.625) 31(2.54,7.625) 32(1.27,7.625)
  rect 3.2x0.7 smd: 5(-6.33,5.08) 6(-6.33,3.81) 7(-6.33,2.54) 8(-6.33,1.27) 9(-6.33,0) 10(-6.33,-1.27) 11(-6.33,-2.54) 12(-6.33,-3.81) 13(-6.33,-5.08) 21(6.33,-5.08) 22(6.33,-3.81) 23(6.33,-2.54) 24(6.33,-1.27) 25(6.33,0) 26(6.33,1.27) 27(6.33,2.54) 28(6.33,3.81) 29(6.33,5.08)
  silkscreen extent -9.09,-10.38 9.09,10.38
PW20 [mm]
  rect 1.462x0.355 smd paste+0 mask+0: 1(-2.921,2.925) 2(-2.921,2.275) 3(-2.921,1.625) 4(-2.921,0.975) 5(-2.921,0.325) 6(-2.921,-0.325) 7(-2.921,-0.975) 8(-2.921,-1.625) 9(-2.921,-2.275) 10(-2.921,-2.925) 11(2.921,-2.925) 12(2.921,-2.275) 13(2.921,-1.625) 14(2.921,-0.975) 15(2.921,-0.325) 16(2.921,0.325) 17(2.921,0.975) 18(2.921,1.625) 19(2.921,2.275) 20(2.921,2.925)
  silkscreen extent -3.51,-3.43 2.13,3.96, body extent -3.3,-3.3 3.3,3.3, height 1.2
PW24 [mm]
  rect 1.462x0.355 smd paste+0 mask+0: 1(-2.921,3.575) 2(-2.921,2.925) 3(-2.921,2.275) 4(-2.921,1.625) 5(-2.921,0.975) 6(-2.921,0.325) 7(-2.921,-0.325) 8(-2.921,-0.975) 9(-2.921,-1.625) 10(-2.921,-2.275) 11(-2.921,-2.925) 12(-2.921,-3.575) 13(2.921,-3.575) 14(2.921,-2.925) 15(2.921,-2.275) 16(2.921,-1.625) 17(2.921,-0.975) 18(2.921,-0.325) 19(2.921,0.325) 20(2.921,0.975) 21(2.921,1.625) 22(2.921,2.275) 23(2.921,2.925) 24(2.921,3.575)
  silkscreen extent -2.12,-4.08 2.12,4.08, body extent -3.3,-3.95 3.3,3.95, height 1.2
"resistor 0603" [mm] "resistor SMD 0.0625W 0603 1.6mm x 0.8mm"
  rect 0.75x1 smd: 1(-0.75,0) 2(0.75,0)
  silkscreen extent -1.39,-0.77 1.39,0.77, body extent -0.77,-0.42 0.78,0.43, height 0.45
"Slide switch 2mm pitch" [mm] "slide switch 3 pins, 2mm pitch"
  round 1.4 / inner round 1.7 / far side round 1.4 hole 0.65: 1(-2,0) 2(0,0) 3(2,0)
  oval 1.3x2 hole 0.5 slot 1.3 at 90 deg: ""(-4.15,0) ""(4.15,0)
  silkscreen extent -4.3,-2.22 4.3,2.22
"SOP8 / SOIC8 without dissipation" [mm] "SOIC8 without heat dissipation pad"
  rect 0.6x1.9 smd: 1(-1.905,-2.875) 2(-0.635,-2.875) 3(0.635,-2.875) 4(1.905,-2.875) 5(1.905,2.875) 6(0.635,2.875) 7(-0.635,2.875) 8(-1.905,2.875)
  silkscreen extent -2.64,-2.75 2.51,1.85, body extent -2.51,-3.02 2.51,3.02, height 1.6
sot-23 [mm] "sot-23"
  rect 0.8x0.9 smd: 1(1,-0.95) 2(1,0.95) 3(-1,0)
  silkscreen extent -0.71,-1.55 -0.05,1.55, body extent -1.21,-1.45 1.21,1.45, height 0.98
"Tact switch" [mm] "Tact switch"
  round 2 hole 1: 1(-3.25,-2) 2(3.25,-2) 3(3.25,2) 4(-3.25,2)
  silkscreen extent -3,-3 3,3
"TSOP II - 44pin" [mm] "TSOP II - 44pin"
  rect 1.21x0.5 smd: 1(-5.685,8.4) 2(-5.685,7.6) 3(-5.685,6.8) 4(-5.685,6) 5(-5.685,5.2) 6(-5.685,4.4) 7(-5.685,3.6) 8(-5.685,2.8) 9(-5.685,2) 10(-5.685,1.2) 11(-5.685,0.4) 12(-5.685,-0.4) 13(-5.685,-1.2) 14(-5.685,-2) 15(-5.685,-2.8) 16(-5.685,-3.6) 17(-5.685,-4.4) 18(-5.685,-5.2) 19(-5.685,-6) 20(-5.685,-6.8) 21(-5.685,-7.6) 22(-5.685,-8.4) 23(5.685,-8.4) 24(5.685,-7.6) 25(5.685,-6.8) 26(5.685,-6) 27(5.685,-5.2) 28(5.685,-4.4) 29(5.685,-3.6) 30(5.685,-2.8) 31(5.685,-2) 32(5.685,-1.2) 33(5.685,-0.4) 34(5.685,0.4) 35(5.685,1.2) 36(5.685,2) 37(5.685,2.8) 38(5.685,3.6) 39(5.685,4.4) 40(5.685,5.2) 41(5.685,6) 42(5.685,6.8) 43(5.685,7.6) 44(5.685,8.4)
  silkscreen extent -6.98,-9.16 5.5,9.38, body extent -5.3,-9.1 5.3,9.1, height 1.2